# Altium PCB node.PcbDoc
Units mm, origin at the board's own origin, x right, y up, seen from the top; angles counter-clockwise.
Board outline 91.95 x 76.96 mm, 2 copper layers (Top Layer, Bottom Layer); 12 components, 15 nets, 92 pads, 11 vias.
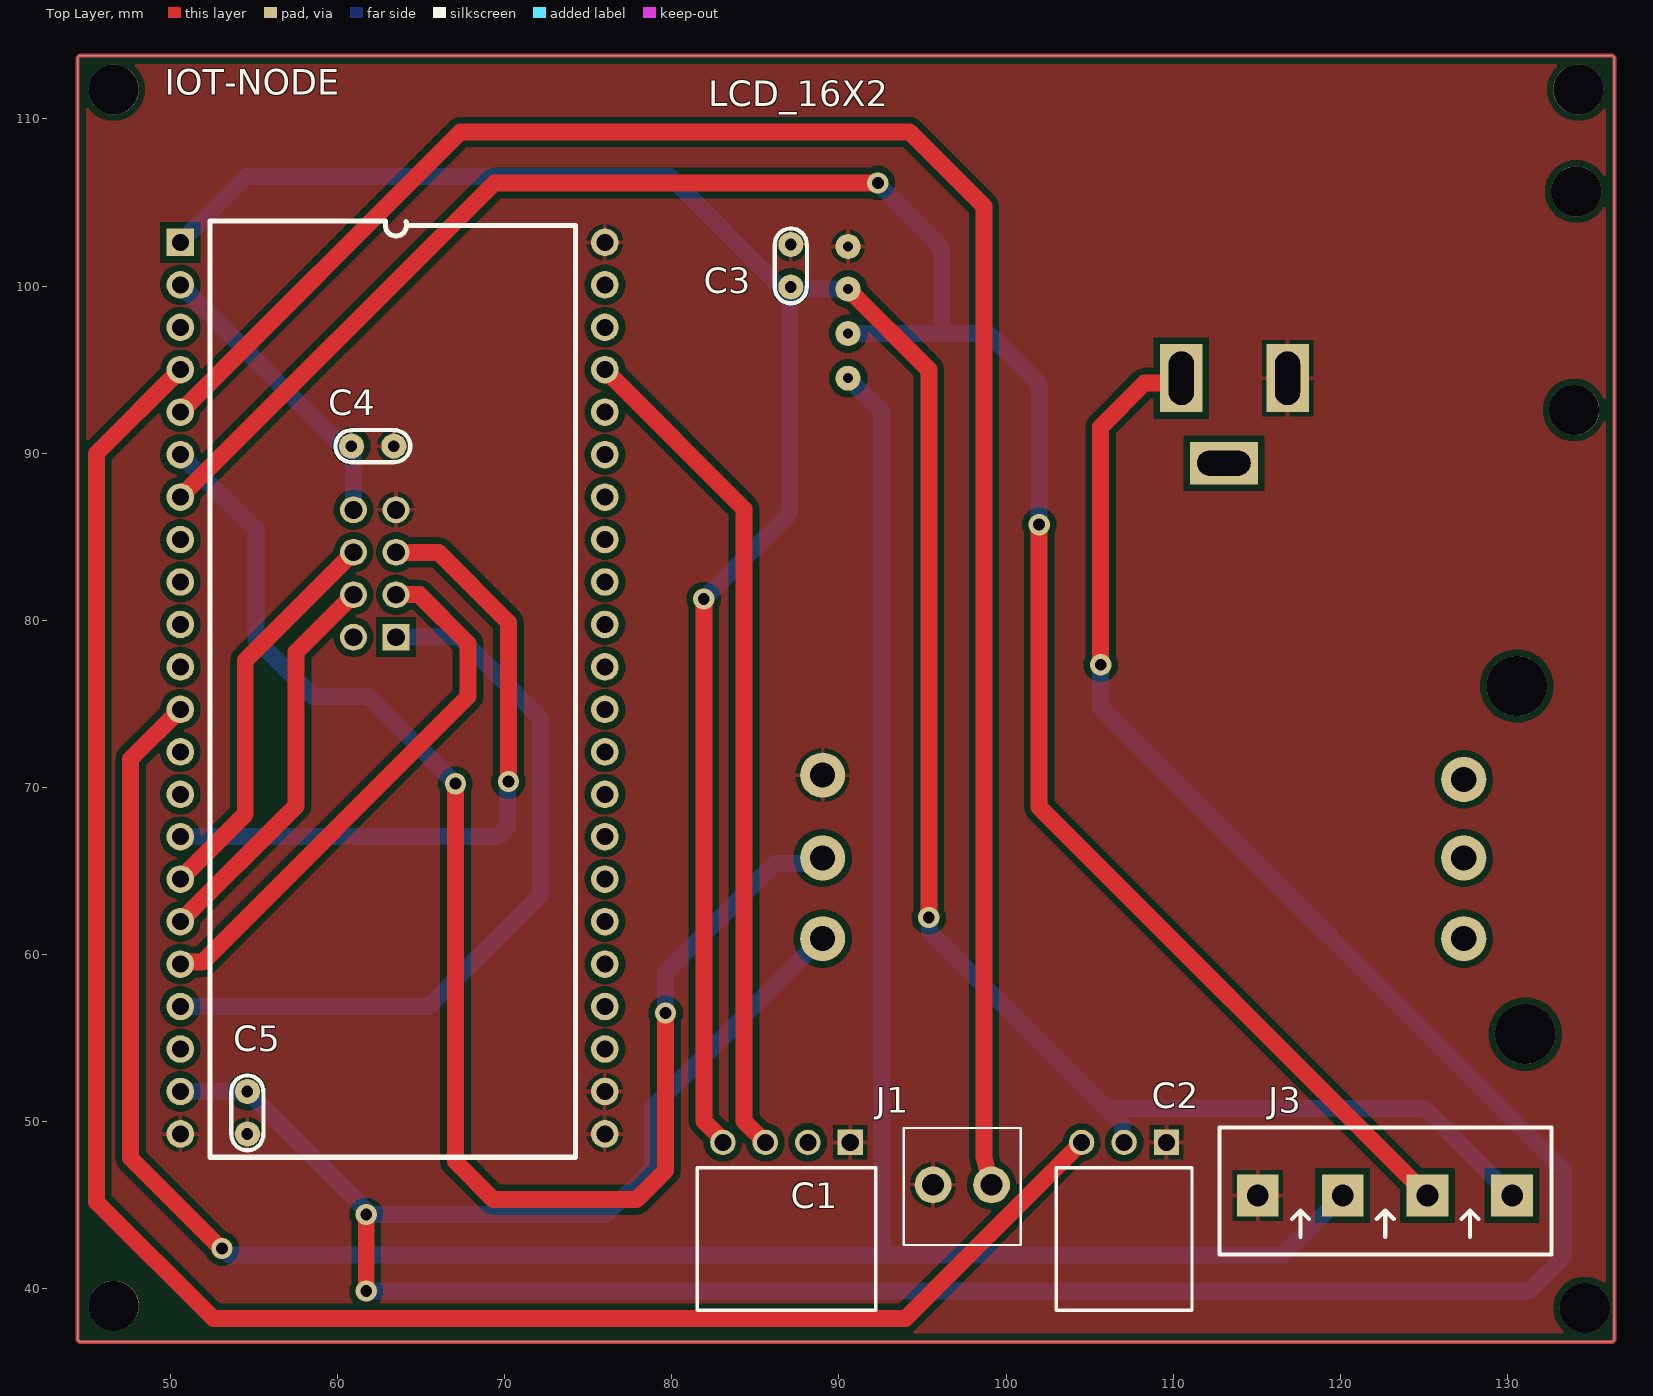
[diagram p0: Top Layer view]
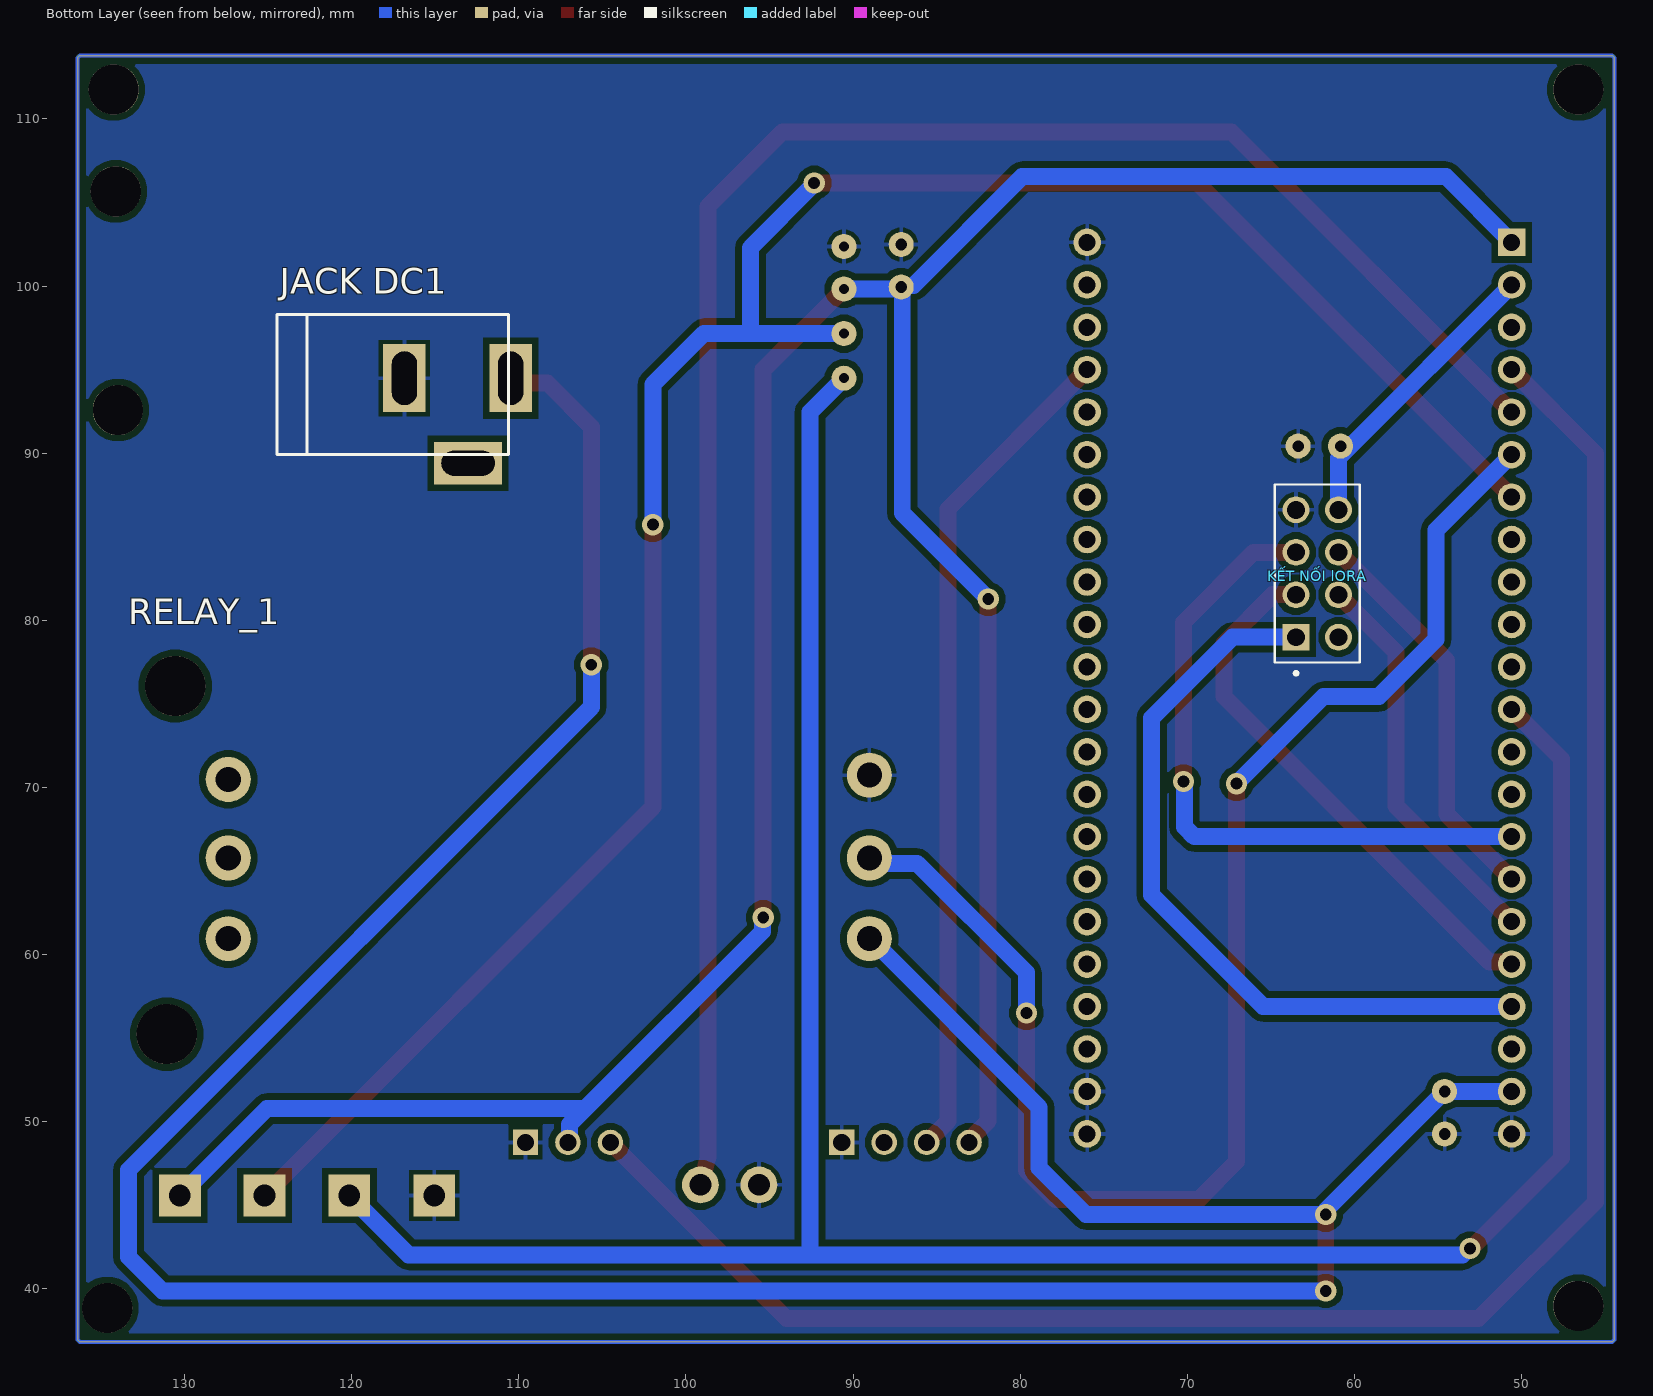
[diagram p1: Bottom Layer view, seen from below]

## Layer stack, top to bottom
Top Solder: solder mask 0.0102, Solder Resist, Dk 3.5
Top Layer: signal copper 0.0356
Dielectric 1: dielectric 0.32, FR-4, Dk 4.8
Bottom Layer: signal copper 0.0356
Bottom Solder: solder mask 0.0102, Solder Resist, Dk 3.5

## Board outline
44.45,36.957 44.45,113.665 44.577,113.792 136.271,113.792 136.398,113.665 136.398,36.957 136.271,36.83 44.577,36.83

## Design rules (kind name [scope] priority, off if disabled: settings)
Clearance [All] p1: gap=0.381 ignorepadtopadclearanceinfootprint=FALSE
PolygonConnect [All] p1: connectstyle=Relief reliefconductorwidth=0.254 reliefentries=4 polygonreliefangle="90 Angle" airgapwidth=0.254
RoutingVias [All] p1: holewidth=0.711 width=1.27 viastyle="Through Hole" minholewidth=0.711 minwidth=1.27 maxholewidth=0.711 maxwidth=1.27
SolderMaskExpansion [All] p1: expansion=0.102 istentingtop=FALSE
Width [All] p1: maxlimit=1.27 minlimit=0.762 preferedwidth=1.016
Width GND [InNet('D2-')] p2: maxlimit=1.524 minlimit=1.524 preferedwidth=1.524
Width 5V [InNet('D2+')] p3: maxlimit=1.524 minlimit=1.524 preferedwidth=1.524
30 further rules are at their usual default settings.

## Classes and differential pairs
component class Sheet1: C1 C2 C3 C4 C5 IOT-NODE J1 J3 "JACK DC1" LCD_16X2 RELAY_1

## Components (designator, comment, footprint, x,y, rotation, side; value= is the part's Value field where it differs from the comment)
C1 "JP4" JP4-C1C 86.868,48.768 r180 top
C2 "JP3" JP3-C1C 107.061,48.768 r180 top
C3 "104" "tu gom" 87.122,101.219 r90 top
C4 "104" "tu gom" 62.103,90.424 r180 top
C5 "104" "tu gom" 54.61,50.546 r90 top
IOT-NODE "Component_1" ESP32_S3_N16R8_44 47.498,108.331 r0 top
J1 "KF2" KF2-3.5 97.381,46.228 r0 top
J3 "KF4" KF4-5.08 115.062,45.593 r0 top
"JACK DC1" "JACK DC 5.5" "JACK DC 5.5" 113.665,91.948 r180 bottom value="Jac DC"
"KẾT NỐI lORA" "ra_SX1278" SULLINS_PPPC042LFBN-RC 62.23,82.804 r270 bottom
LCD_16X2 "" LCD_1602_I2C_DRIVE 127.762,98.171 r0 top
RELAY_1 "RELAY_5V" RELAY_5V 77.47,851.916 r0 bottom

## Footprints (in the part's own frame and the unit in brackets; to place one, negate y for a bottom-side part, rotate by r counter-clockwise, add the part's x,y. Pads: shape width x height; smd on the part's side, far side on the other; paste and mask are expansions set on the pad)
ESP32_S3_N16R8_44 [mil]
  round 65 hole 40: 0(1122.05,-1525) 1(1122.05,-525) 2(1122.05,-625) 3(122.05,-1425) 4(122.05,-525) 5(122.05,-625) 6(122.05,-725) 7(122.05,-825) 8(122.05,-1325) 9(122.05,-1625) 10(122.05,-1725) 11(122.05,-1825) 12(122.05,-1925) 13(122.05,-2025) 14(122.05,-2125) 15(122.05,-925) 16(122.05,-1025) 17(122.05,-1125) 18(122.05,-1225) 19(1122.05,-2125) 20(1122.05,-2025) 21(1122.05,-1925) 22(122.05,-2325) 23(1122.05,-2325) 24(1122.05,-2225) 35(1122.05,-1425) 36(1122.05,-1325) 37(1122.05,-1225) 38(1122.05,-1125) 39(1122.05,-1025) 40(1122.05,-925) 41(1122.05,-825) 42(1122.05,-725) 43(1122.05,-325) 44(1122.05,-225) 45(1122.05,-1625) 46(122.05,-1525) 47(1122.05,-1825) 48(1122.05,-1725) 50(1122.05,-425) 52(122.05,-325) 53(122.05,-425) 54(122.05,-2225)
  rect 65x65 hole 40: 51(122.05,-225)
  silkscreen extent 192,-2380 1053,-175, body extent 75,-2403 1175,93, height 679
"JACK DC 5.5" [mm] "Jac DC input"
  rect 2.54x4.064 hole 1.5 slot 3.2 at 90 deg: 1(3.175,2.54) 2(-3.175,2.54)
  rect 4.064x2.54 hole 1.5 slot 3.2 at 0 deg: 3(0.635,-2.54)
  silkscreen extent -10.79,-2.03 3.05,6.35, body extent -10.42,-2.67 3.4,6.84, height 11.02
JP3-C1C [mm] "03p 1 row Right angle"
  rect 1.52x1.52 hole 1.02: 1(-2.54,0)
  round 1.52 hole 1.02: 2(0,0) 3(2.54,0)
  silkscreen extent -4.06,1.52 4.06,10.03, body extent -4.06,-0.25 4.06,10.05, height 2.51
JP4-C1C [mm] "04p 1 row Right angle"
  rect 1.52x1.52 hole 1.02: 1(-3.81,0)
  round 1.52 hole 1.02: 2(-1.27,0) 3(1.27,0) 4(3.81,0)
  silkscreen extent -5.33,1.52 5.33,10.03, body extent -5.33,-0.25 5.33,10.05, height 2.51
KF2-3.5 [mm] "3,50mm - modular - blue - Horizontal wire entry - Pressure clamp - 8,4mm height - 02p"
  round 2.2 hole 1.3: 1(-1.75,0) 2(1.75,0)
  silkscreen extent -3.5,-3.6 3.5,3.4, body extent -3.95,-3.6 4.05,3.4, height 8.41
KF4-5.08 [mm]
  rect 2.5x2.5 hole 1.3: 1(0,0) 2(5.08,0) 3(10.147,0) 4(15.215,0)
  silkscreen extent -2.29,-3.53 17.58,4.06, body extent -2.36,-3.43 17.64,4.07, height 10
LCD_1602_I2C_DRIVE [mm]
  round 1.5 hole 0.6: 1(-37.211,4.191) 2(-37.211,1.651) 3(-37.211,-1.016) 4(-37.211,-3.683)
  body extent -45.85,-24.44 34.34,11.56, height 23
RELAY_5V [mm]
  round 2.7 hole 1.5: 1(11.557,790.956) 2(11.557,786.13) 3(11.557,781.177) 4(49.911,781.431) 5(49.911,786.13) 6(49.911,790.956)
  round 3.6 hole 3.6: 93(53.086,775.843) 93(53.594,796.671)
  body extent 4.98,773.38 55.88,798.88, height 16.43
SULLINS_PPPC042LFBN-RC [mm]
  rect 1.605x1.605 / inner round 1.605 / far side rect 1.605x1.605 hole 1.07: 1(3.81,-1.27)
  round 1.605 hole 1.07: 2(1.27,-1.27) 3(-1.27,-1.27) 4(-3.81,-1.27) 5(-3.81,1.27) 6(-1.27,1.27) 7(1.27,1.27) 8(3.81,1.27)
  silkscreen extent -5.33,-2.54 6.07,2.54, body extent -5.33,-2.54 5.33,2.54, height 8.51
"tu gom" [mm] "Tu gom mini"
  round 1.5 hole 0.7: 1(-1.27,0) 2(1.27,0)
  silkscreen extent -2.25,-0.97 2.22,0.97, body extent -2.92,-0.85 2.92,0.85, height 6.12

## Part data
C1: "WR-PHD 2.54 mm Angled Socket Header", Manufacturer="W¨¹rth Elektronik eiSos GmbH", PartNo=613004143121, ComponentLink1 Description=Manufacturer, ComponentLink1URL=http://www.we-online.com, ComponentLink2 Description=Datasheet, ComponentLink2URL=http://katalog.we-online.de/em/datasheet/6130xx143121.pdf, Created By="Karrer Zheng", Created Date="29 March 2013", NoPins=04
C2: "WR-PHD 2.54 mm Angled Socket Header", Manufacturer="W¨¹rth Elektronik eiSos GmbH", PartNo=613003143121, ComponentLink1 Description=Manufacturer, ComponentLink1URL=http://www.we-online.com, ComponentLink2 Description=Datasheet, ComponentLink2URL=http://katalog.we-online.de/em/datasheet/6130xx143121.pdf, Created By="Karrer Zheng", Created Date="29 March 2013", NoPins=03
C3 C4 C5: library part "Tu gom 104 50V", "Cắm", Chung_Loai=Cắm, Don_Vi=Con, Ma_Hang=MH004761, So_Chan=2, Ten_Linh_Kien="Tụ gốm 104 100nF 50V"
J1: Manufacturer="Würth Elektronik eiSos GmbH", PartNo=691103110002, ComponentLink1 Description=Manufacturer, ComponentLink1URL=http://www.we-online.com, ComponentLink2 Description=Datasheet, ComponentLink2URL=http://katalog.we-online.de/em/datasheet/6911031100xx.pdf, Created By="Karrer Zheng", Created Date="29 October 2013", NoPins=2
J3: Manufacturer="W¨¹rth Elektronik eiSos GmbH", PartNo=691133710004, ComponentLink1 Description=Manufacturer, ComponentLink1 URL=http://www.we-online.com, ComponentLink2 Description=Datasheet, ComponentLink2 URL=http://katalog.we-online.de/em/datasheet/6911337100xx.pdf, Created By="Baojun Chen", Created Date=4-Aug-15, NoPins=4
LCD_16X2: library part LCD_1602_I2C_DRIVE

## Free pads (board coordinates)
  round 3 hole 3: 97(46.609,38.989) 97(46.609,111.76) 97(133.985,92.583) 97(134.112,105.664) 97(134.239,111.76) 97(134.62,38.862)

## Via types
v1: diameter 1.27, hole 0.711, Top Layer to Bottom Layer, 11 vias

## Nets (pads, with @x,y where several pads share a name; then routed paths per layer and width w, separated by ;. In a path a pad name is that pad's centre, name@x,y a point inside that pad or via, vN(x,y) a via of type N, cw(c..) or ccw(c..) an arc to the next point about the centre after c; other vN are vias at no path point)
D2+: "JACK DC1.1" C5.2 IOT-NODE.54 RELAY_1.1 | length 194.8
  Top Layer w1.016: v1(61.722,39.878) v1(61.722,44.45) ; v1(105.664,77.343) 105.664,91.567 108.291,94.194 110.196,94.194 110.49,94.488
  Bottom Layer w1.016: IOT-NODE.54 C5.2 61.673,44.753 61.673,44.499 v1(61.722,44.45) 76.073,44.45 78.867,47.244 78.867,50.86 88.967,60.96 RELAY_1.1 ; v1(61.722,39.878) 131.318,39.878 133.35,41.91 133.35,47.117 105.664,74.803 v1(105.664,77.343)
DA1: C1.3 IOT-NODE.1 | length 50.2
  Top Layer w1.016: IOT-NODE.1 84.328,86.666 84.328,50.038 C1.3
DA11: IOT-NODE.7 J3.3 LCD_16X2.3 | length 130.9
  Top Layer w1.016: IOT-NODE.7 69.394,106.172 v1(92.329,106.172) ; v1(101.981,85.725) 101.981,68.821 J3.3
  Bottom Layer w1.016: LCD_16X2.3 96.139,97.155 ; v1(92.329,106.172) 92.329,106.103 96.139,102.293 96.139,97.155 ; v1(101.981,85.725) 101.981,94.107 98.933,97.155 96.139,97.155
DA111: IOT-NODE.8 J3.2 LCD_16X2.4 | length 157.8
  Top Layer w1.016: IOT-NODE.8 47.625,71.703 47.625,47.828 53.035,42.418 v1(53.086,42.418)
  Bottom Layer w1.016: v1(53.086,42.418) 53.155,42.418 53.536,42.037 92.583,42.037 ; LCD_16X2.4 92.583,92.456 92.583,42.037 ; J3.2 116.586,42.037 92.583,42.037
GND1: "JACK DC1.2" "KẾT NỐI lORA.4" C1.1 C2.1 C3.2 C4.1 C5.1 IOT-NODE.22 IOT-NODE.23 IOT-NODE.24 IOT-NODE.44 J1.1 J3.1 LCD_16X2.1 RELAY_1.3
MI1: "KẾT NỐI lORA.1" IOT-NODE.13 | length 45.5
  Bottom Layer w1.016: IOT-NODE.13 65.465,56.896 72.136,63.567 72.136,74.168 67.31,78.994 63.5,78.994
MO1: "KẾT NỐI lORA.7" IOT-NODE.11 | length 23.9
  Top Layer w1.016: IOT-NODE.11 57.531,68.909 57.531,78.105 60.96,81.534
NS1: "KẾT NỐI lORA.6" IOT-NODE.10 | length 23.9
  Top Layer w1.016: IOT-NODE.10 54.483,68.401 54.483,77.597 60.96,84.074
O1: C2.3 IOT-NODE.4 | length 118
  Top Layer w1.016: IOT-NODE.4 45.593,89.991 45.593,45.212 52.578,38.227 93.98,38.227 C2.3
PDT1: IOT-NODE.5 J1.2 | length 115.5
  Top Layer w1.016: IOT-NODE.5 67.362,109.22 94.234,109.22 98.679,104.775 98.679,47.867 J1.2
RL1: IOT-NODE.6 RELAY_1.2 | length 89.4
  Top Layer w1.016: v1(67.056,70.231) 67.056,47.625 69.342,45.339 77.891,45.339 79.629,47.077 v1(79.629,56.515)
  Bottom Layer w1.016: IOT-NODE.6 55.118,85.396 55.118,78.867 58.547,75.438 61.849,75.438 v1(67.056,70.231) ; v1(79.629,56.515) 79.629,58.928 86.165,65.464 88.705,65.464 RELAY_1.2
RS1: "KẾT NỐI lORA.3" IOT-NODE.9 | length 40.5
  Top Layer w1.016: 63.5,84.074 66.04,84.074 70.231,79.883 v1(70.231,70.354)
  Bottom Layer w1.016: IOT-NODE.9 69.587,67.056 70.182,67.651 70.182,70.306 v1(70.231,70.354)
SC1: "KẾT NỐI lORA.2" IOT-NODE.12 | length 32.6
  Top Layer w1.016: IOT-NODE.12 50.72,59.558 51.938,59.558 67.818,75.438 67.818,78.613 64.897,81.534 63.5,81.534
VCC1: C1.4 C2.2 C3.1 IOT-NODE.51 J3.4 LCD_16X2.2 | length 181.7
  Top Layer w1.016: v1(81.915,81.28) 81.915,50.047 83.058,48.904 C1.4 ; LCD_16X2.2 95.377,94.996 v1(95.377,62.23)
  Bottom Layer w1.016: IOT-NODE.51 54.535,106.553 79.883,106.553 C3.1@86.394,100.042 ; v1(81.915,81.28) 87.058,86.423 87.058,99.885 87.122,99.822 LCD_16X2.2 ; v1(95.377,62.23) 95.426,62.181 95.426,61.394 106.02,50.8 ; C2.2 106.965,48.864 106.965,49.855 106.02,50.8 ; J3.4 125.07,50.8 106.02,50.8
"vcc lora": "KẾT NỐI lORA.5" C4.2 IOT-NODE.52 | length 18.2
  Bottom Layer w1.016: IOT-NODE.52 C4.2@60.542,90.133 ; C4.2 C4.2@60.542,90.133 ; 60.96,86.614 60.96,89.714 C4.2@60.542,90.133
pads on no net: "JACK DC1.3" "KẾT NỐI lORA.8" C1.2 IOT-NODE.0 IOT-NODE.2 IOT-NODE.3 IOT-NODE.14 IOT-NODE.15 IOT-NODE.16 IOT-NODE.17 IOT-NODE.18 IOT-NODE.19 IOT-NODE.20 IOT-NODE.21 IOT-NODE.35 IOT-NODE.36 IOT-NODE.37 IOT-NODE.38 IOT-NODE.39 IOT-NODE.40 IOT-NODE.41 IOT-NODE.42 IOT-NODE.43 IOT-NODE.45 IOT-NODE.46 IOT-NODE.47 IOT-NODE.48 IOT-NODE.50 IOT-NODE.53 RELAY_1.4 RELAY_1.5 RELAY_1.6 RELAY_1.93
copper on no net: | length 675
  Top Layer w0.254: 44.45,36.957 44.45,113.665 44.577,113.792 136.271,113.792 136.398,113.665 136.398,36.957 136.271,36.83 44.577,36.83 44.45,36.957
  Bottom Layer w0.254: 44.45,36.979 44.45,113.643 44.599,113.792 136.249,113.792 136.398,113.643 136.398,36.979 136.249,36.83 44.599,36.83 44.45,36.979

## Polygon pours and split planes (outlines as drawn)
GND1 on Bottom Layer "GND1_L02_P002" (solid, remove dead copper, pour order 2): 44.45,113.643 44.599,113.792 136.249,113.792 136.398,113.643 136.398,36.979 136.249,36.83 44.599,36.83 44.45,36.979
GND1 on Top Layer "GND1_L01_P003" (solid, remove dead copper, pour order 3): 44.45,113.665 44.577,113.792 136.271,113.792 136.398,113.665 136.398,36.957 136.271,36.83 44.577,36.83 44.45,36.957